# Altium PCB esp32-nrf24l01-jam_V2_backup.PcbDoc
Units mm, origin at the board's own origin, x right, y up, seen from the top; angles counter-clockwise.
Board outline 80 x 55 mm, 2 copper layers (Top Layer, Bottom Layer); 22 components, 23 nets, 98 pads, 63 vias.
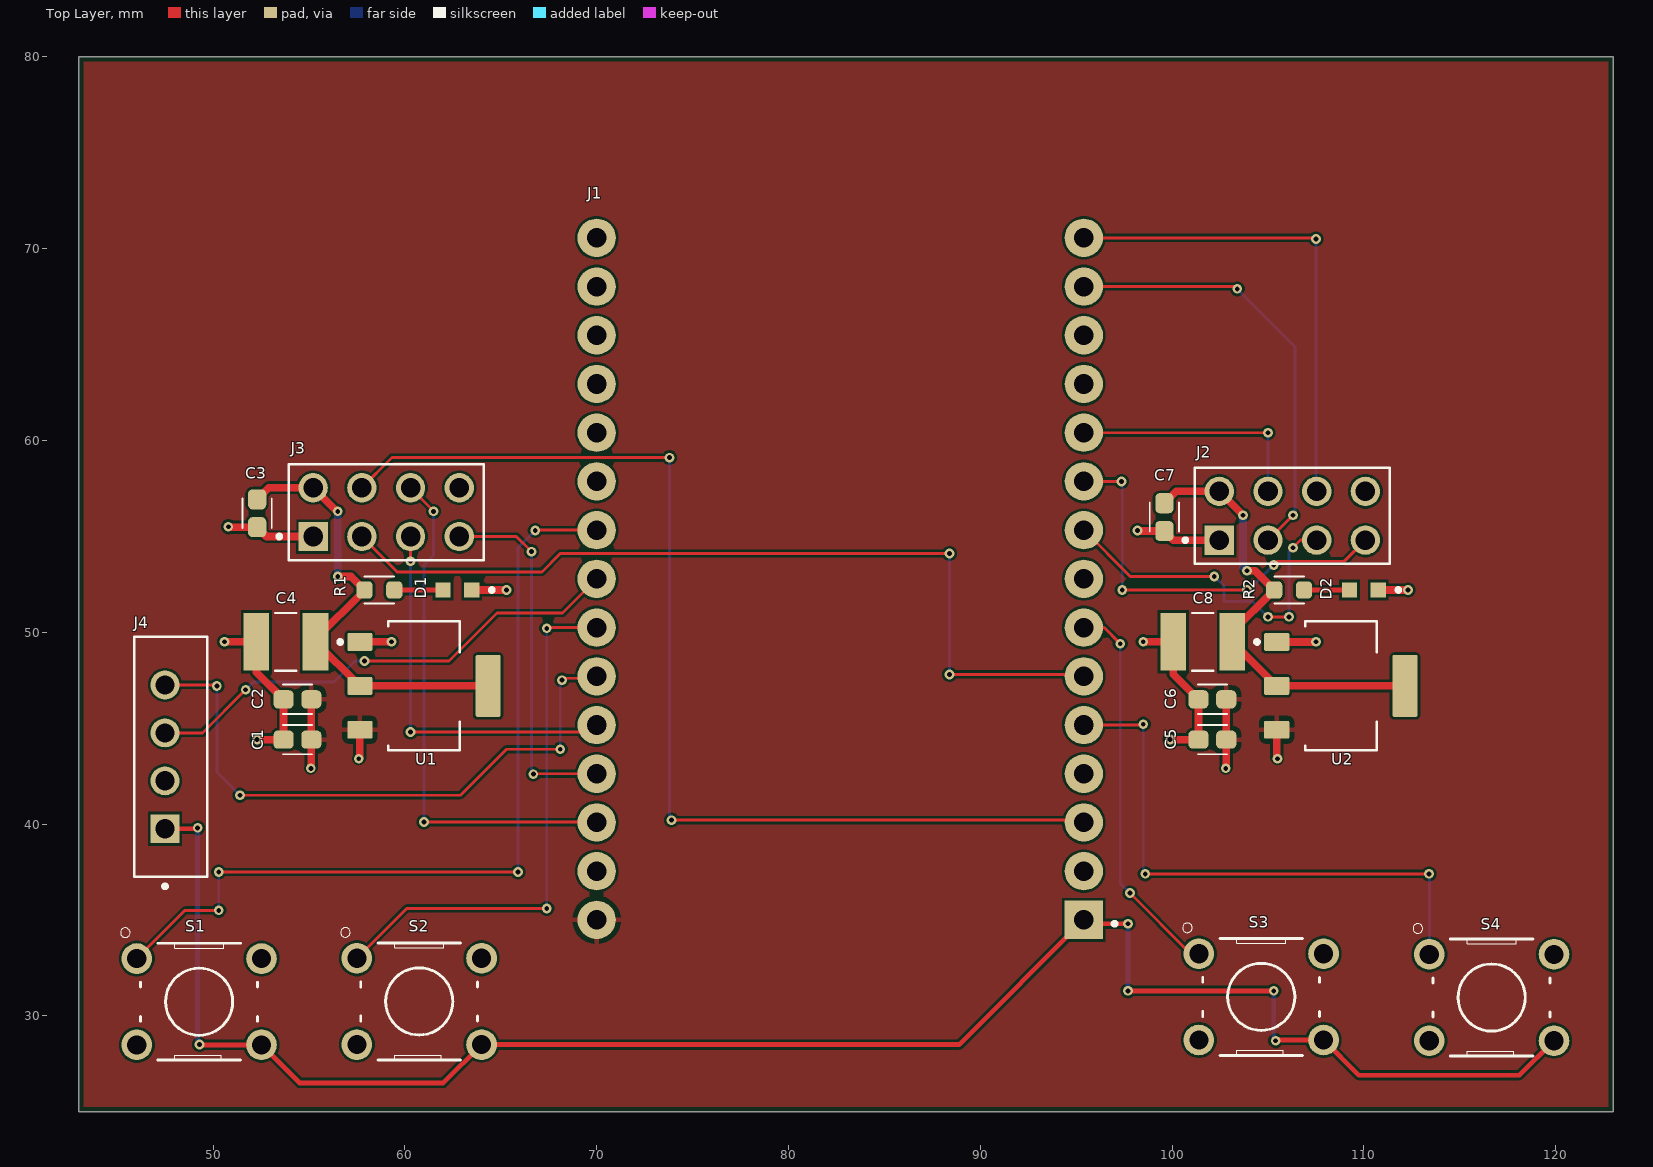
[diagram p0: Top Layer view]
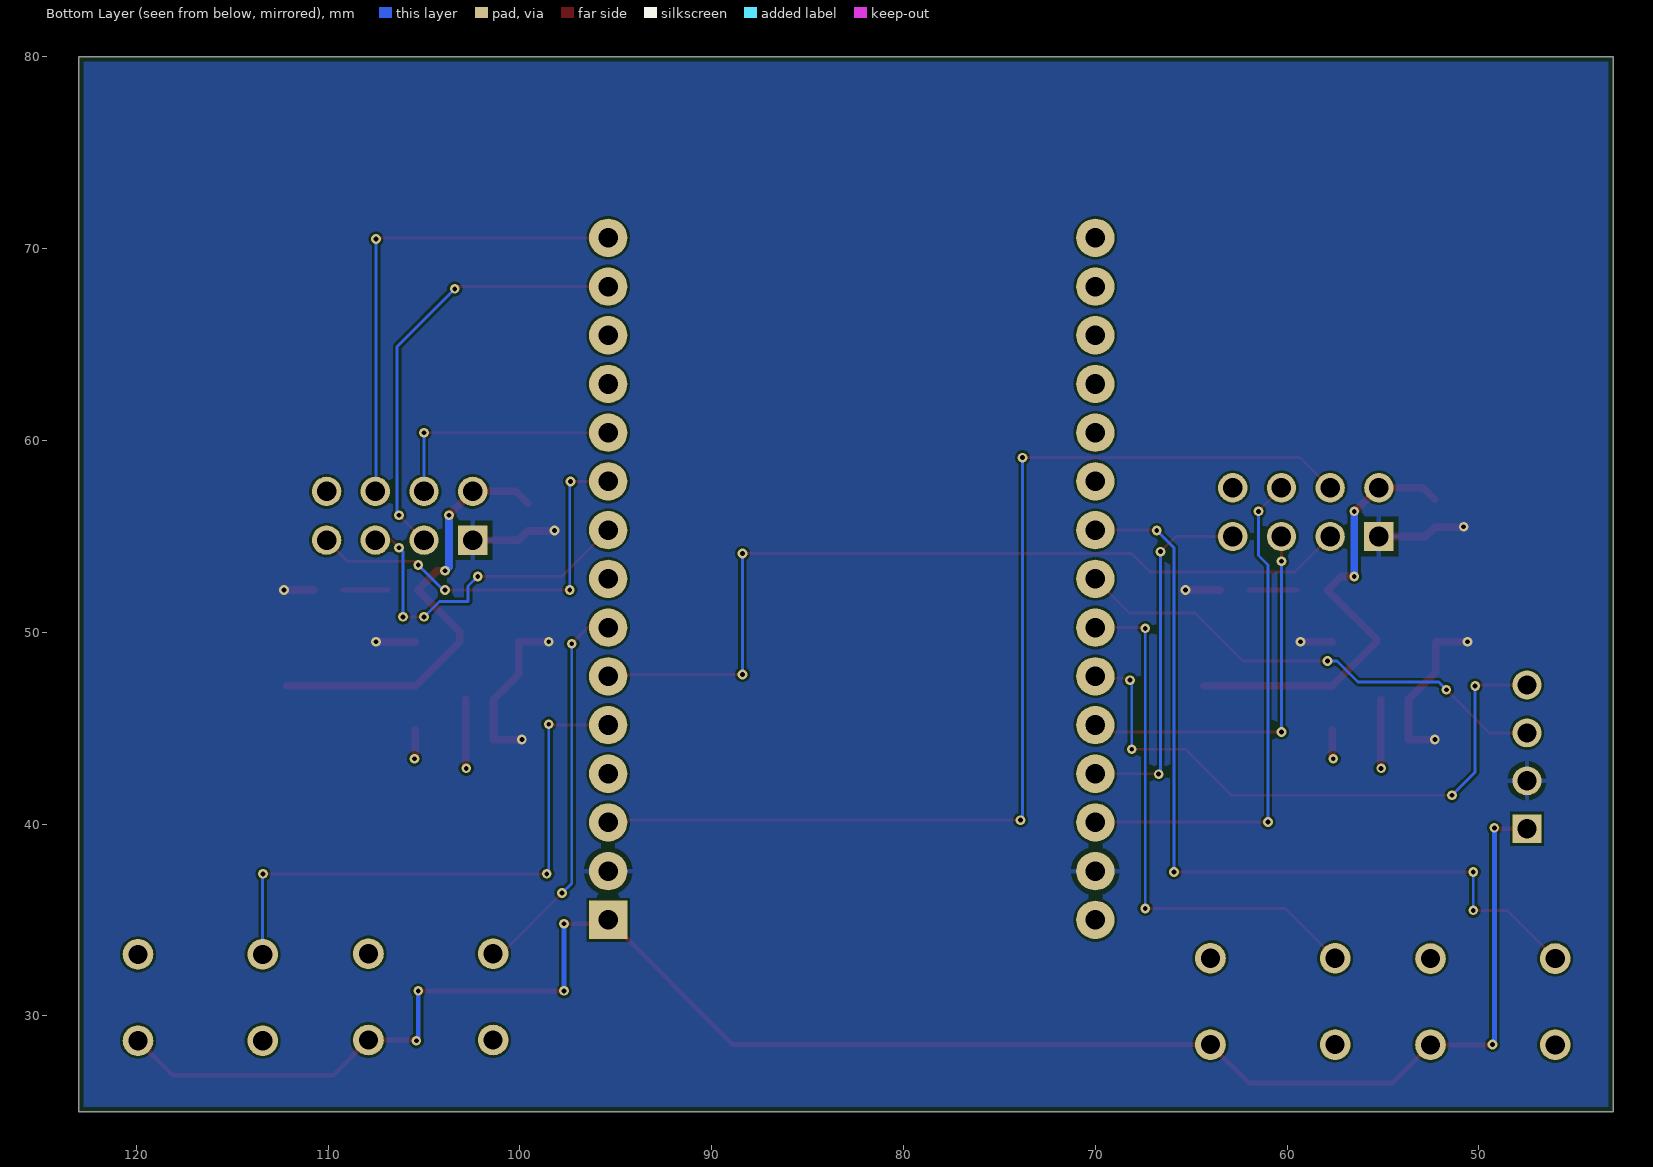
[diagram p1: Bottom Layer view, seen from below]
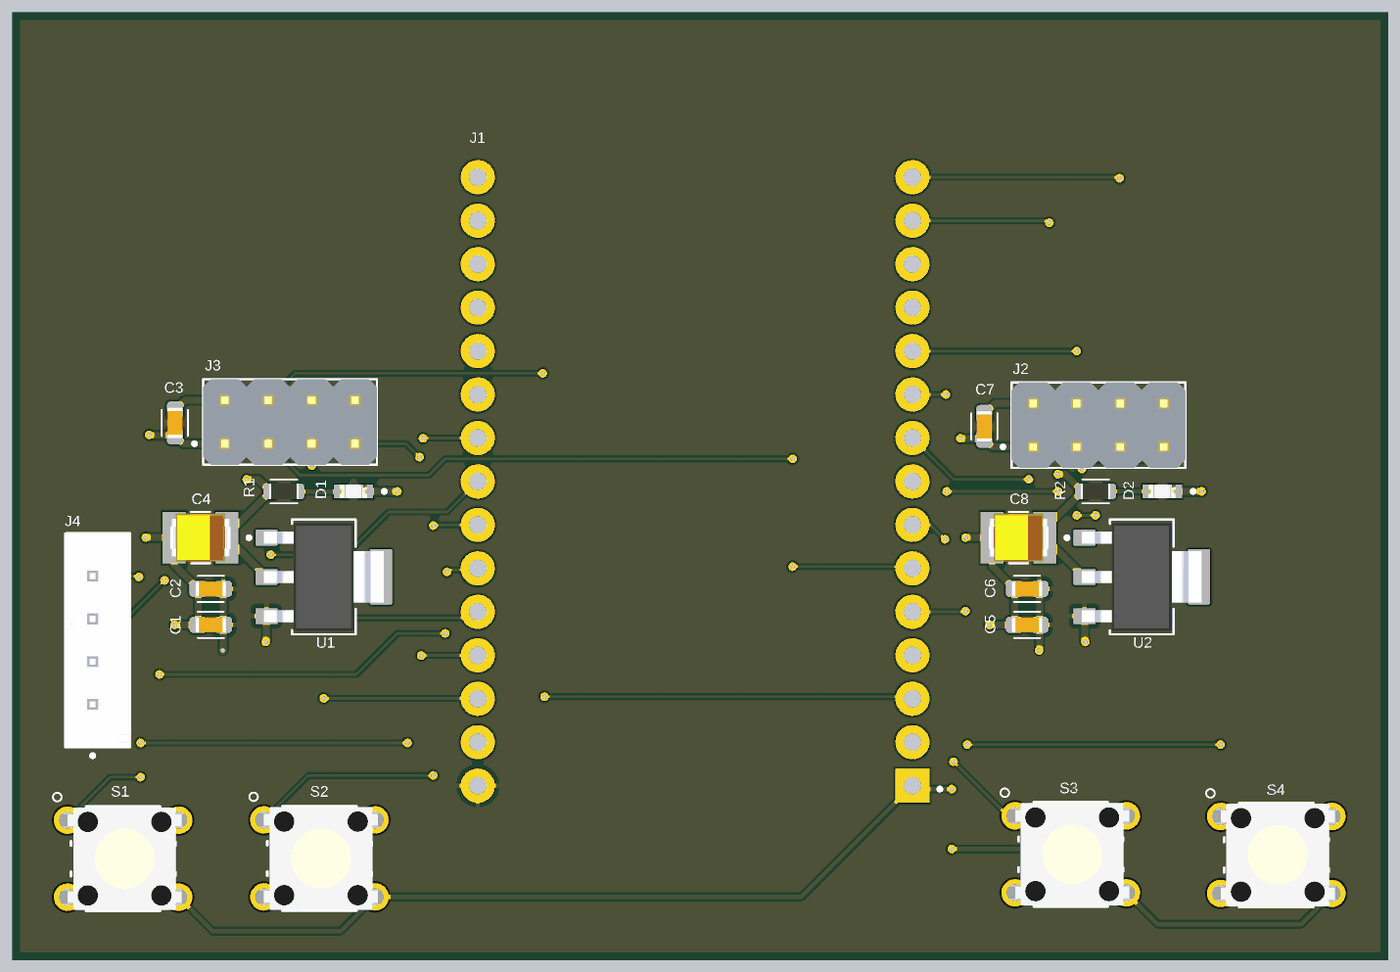
[diagram p2: 3D render of the assembled board from above, using the file's embedded part models]

## Layer stack, top to bottom
Top Solder: solder mask 0.0102, Solder Resist, Dk 3.5
Top Layer: signal copper 0.0356
Dielectric 1: dielectric 0.32, FR-4, Dk 4.8
Bottom Layer: signal copper 0.0356
Bottom Solder: solder mask 0.0102, Solder Resist, Dk 3.5

## Board outline
43,25 123,25 123,80 43,80

## Design rules (kind name [scope] priority, off if disabled: settings)
BoardOutlineClearance [All] p1: gap=0.25 ignorepadtopadclearanceinfootprint=FALSE
Clearance [All] p1: gap=0.127 ignorepadtopadclearanceinfootprint=FALSE
MinimumSolderMaskSliver [All] p1: minsoldermaskwidth=0.1
PolygonConnect [All] p1: thpad.connectstyle=Relief thpad.reliefconductorwidth=0.254 thpad.reliefentries=4 thpad.polygonreliefangle="90 Angle" thpad.airgapwidth=0.254 smdpad.connectstyle=Relief smdpad.reliefconductorwidth=0.254 smdpad.reliefentries=4 smdpad.polygonreliefangle="90 Angle" smdpad.airgapwidth=0.254 via.connectstyle=Direct via.reliefconductorwidth=0.254 via.reliefentries=4 via.polygonreliefangle="90 Angle" via.airgapwidth=0.254
RoutingVias [All] p1: holewidth=0.254 width=0.508 viastyle="Through Hole" minholewidth=0.254 minwidth=0.508 maxholewidth=0.254 maxwidth=0.508
SilkToSilkClearance [All] p1: silktosilkclearance=0.1
SilkToSolderMaskClearance [IsPad] p1: minsilkscreentomaskgap=0.1 clearancetoexposedcopper=TRUE
SolderMaskExpansion [All] p1: expansion=0.05 istentingtop=FALSE
SupplyNets "Schematic Supply Nets" [InNet('GND')] p1: voltage=0.000
Width Width_POWER [InNet('5V') Or InNet('3V3_HSPI') Or InNet('3V3_VSPI') Or InNet('GND')] p1: maxlimit=0.8 minlimit=0.254 preferedwidth=0.4
Width [All] p2: maxlimit=0.254 minlimit=0.127 preferedwidth=0.15
27 further rules are at their usual default settings.

## Components (designator, comment, footprint, x,y, rotation, side; value= is the part's Value field where it differs from the comment)
C1 "10µF" "C0603 - MURATA" 54.4,44.4 r0 top
C2 "100nF" "C0603 - MURATA" 54.4,46.5 r0 top
C3 "100nF" "C0603 - MURATA" 52.3,56.2 r90 top
C4 "22µF" CAPPC3528X210N 53.8,49.5 r180 top
C5 "10µF" "C0603 - MURATA" 102.1,44.4 r0 top
C6 "100nF" "C0603 - MURATA" 102.1,46.5 r0 top
C7 "100nF" "C0603 - MURATA" 99.6,56 r90 top
C8 "22µF" CAPPC3528X210N 101.6,49.5 r180 top
D1 "LED" LED_KT-0603R 62.738,52.197 r180 top value=100µF
D2 "LED" LED_KT-0603R 110,52.2 r180 top value=100µF
J1 "ESP32-DEVKIT-V1" MODULE_ESP32_DEVKIT_V1 82.7,50.515 r180 top
J2 "DS1021-2X4SF162-B" CONNFLY_DS1021-2X4SF162-B 106.27,56.07 r0 top
J3 "DS1021-2X4SF162-B" CONNFLY_DS1021-2X4SF162-B 59.028,56.258 r0 top
J4 "B4B-EH-A" JST_B4B-EH-A 47.498,43.501 r90 top
R1 "1kΩ" "R0603 - YAGEO" 58.674,52.197 r180 top
R2 "1kΩ" "R0603 - YAGEO" 106.1,52.2 r180 top
S1 "B3F-1000" SW_B3F-1000 49.276,30.734 r0 top
S2 "B3F-1000" SW_B3F-1000 60.75,30.75 r0 top
S3 "B3F-1000" SW_B3F-1000 104.648,30.988 r0 top
S4 "B3F-1000" SW_B3F-1000 116.661,30.952 r0 top
U1 "AMS1117-3.3" SOT229P700X180-4N 61,47.2 r270 top
U2 "AMS1117-3.3" SOT229P700X180-4N 108.8,47.2 r270 top

## Footprints (in the part's own frame and the unit in brackets; to place one, negate y for a bottom-side part, rotate by r counter-clockwise, add the part's x,y. Pads: shape width x height; smd on the part's side, far side on the other; paste and mask are expansions set on the pad)
"C0603 - MURATA" [mm]
  rrect50% 1.05x0.95 smd: 1(-0.725,0) 2(0.725,0)
  silkscreen extent -0.76,-0.76 0.76,0.76, body extent -0.9,-0.45 0.9,0.45, height 0.9
CAPPC3528X210N [mm]
  rect 1.34x3.02 smd: 1(-1.54,0) 2(1.54,0)
  silkscreen extent -0.55,-1.5 0.55,1.5, body extent -1.75,-1.4 1.75,1.4, height 2.1
CONNFLY_DS1021-2X4SF162-B [mm]
  rect 1.53x1.53 / inner round 1.53 / far side rect 1.53x1.53 hole 1.02 mask+0.102: 1(-3.81,-1.27)
  round 1.53 hole 1.02 mask+0.102: 2(-3.81,1.27) 3(-1.27,-1.27) 4(-1.27,1.27) 5(1.27,-1.27) 6(1.27,1.27) 7(3.81,-1.27) 8(3.81,1.27)
  silkscreen extent -5.68,-2.5 5.08,2.5, body extent -5.08,-2.5 5.08,2.5, height 7.5
JST_B4B-EH-A [mm]
  rect 1.508x1.508 / inner round 1.508 / far side rect 1.508x1.508 hole 1: 1(-3.75,0)
  round 1.508 hole 1: 2(-1.25,0) 3(1.25,0) 4(3.75,0)
  silkscreen extent -6.85,-2.2 6.25,1.6, body extent -6.25,-2.2 6.25,1.6, height 6
LED_KT-0603R [mm]
  rect 0.8x0.8 smd: 1(-0.75,0) 2(0.75,0)
  silkscreen extent -1.9,-0.1 -1.7,0.1, body extent -0.8,-0.4 0.8,0.4, height 0.65
MODULE_ESP32_DEVKIT_V1 [mm]
  rect 2x2 / inner round 2 / far side rect 2x2 hole 1.02: 1(-12.7,15.515)
  round 2 hole 1.02: 2(-12.7,12.975) 3(-12.7,10.435) 4(-12.7,7.895) 5(-12.7,5.355) 6(-12.7,2.815) 7(-12.7,0.275) 8(-12.7,-2.265) 9(-12.7,-4.805) 10(-12.7,-7.345) 11(-12.7,-9.885) 12(-12.7,-12.425) 13(-12.7,-14.965) 14(-12.7,-17.505) 15(-12.7,-20.045) 16(12.7,-20.045) 17(12.7,-17.505) 18(12.7,-14.965) 19(12.7,-12.425) 20(12.7,-9.885) 21(12.7,-7.345) 22(12.7,-4.805) 23(12.7,-2.265) 24(12.7,0.275) 25(12.7,2.815) 26(12.7,5.355) 27(12.7,7.895) 28(12.7,10.435) 29(12.7,12.975) 30(12.7,15.515)
  silkscreen extent -14.4,15.62 -14.2,15.81
"R0603 - YAGEO" [mm]
  rrect50% 0.85x0.9 smd: 1(-0.775,0) 2(0.775,0)
  silkscreen extent -0.77,-0.7 0.77,0.7, body extent -0.85,-0.45 0.85,0.45, height 0.55
SOT229P700X180-4N [mm]
  rrect15% 0.93x1.31 smd: 1(-2.29,-3.345) 2(0,-3.345) 3(2.29,-3.345)
  rrect15% 3.24x1.31 smd: 2(0,3.345)
  silkscreen extent -3.36,-4.47 3.36,1.86, body extent -3.15,-3.5 3.15,3.5, height 1.8
SW_B3F-1000 [mm]
  round 1.6 hole 1 mask+0.102: 1(-3.25,2.25) 2(3.25,2.25) 3(-3.25,-2.25) 4(3.25,-2.25)
  silkscreen extent -4.1,-3.05 3.05,3.85, body extent -3.76,-3 3.94,3, height 4.3

## Part data
C1 C5: library part "CAP - GENERIC", "16V 10uF X5R ±10% 0603 Multilayer Ceramic Capacitors MLCC - SMD/SMT ROHS", .Case/Package=0603, .Voltage Rating (DC)=16V, Case Code (Metric)=1608, Dielectric Material=Ceramic, Manufacturer=Murata, Manufacturer Lifecycle Status="IN PRODUCTION", Manufacturer Part Number=GRT188R61C106KE13D, Max Operating Temperature=85°C, Min Operating Temperature=-55°C, Ratings=AEC-Q200, Supplier Part Number=490-12317-1-ND, Tolerance=10%, Case Code (Imperial)=0603, Case/Package=0603, Category="Ceramic Capacitors", ComponentLink1Description=https://datasheet.octopart.com:443/GRT188R61C106KE13D-Murata-datasheet-149523582.pdf?src-supplier=Newark, ComponentLink1URL=https://datasheet.octopart.com:443/GRT188R61C106KE13D-Murata-datasheet-149523582.pdf?src-supplier=Newark, ComponentLink2Description=https://datasheet.octopart.com:443/GRT188R61C106KE13D-Murata-datasheet-141284621.pdf?src-supplier=Geoflip, ComponentLink2URL=https://datasheet.octopart.com:443/GRT188R61C106KE13D-Murata-datasheet-141284621.pdf?src-supplier=Geoflip, ComponentLink3Description=https://datasheet.octopart.com:443/GRT188R61C106KE13D-Murata-datasheet-165579666.pdf?src-supplier=TME, ComponentLink3URL=https://datasheet.octopart.com:443/GRT188R61C106KE13D-Murata-datasheet-165579666.pdf?src-supplier=TME, ComponentLink4Description=https://datasheet.octopart.com:443/GRT188R61C106KE13D-Murata-datasheet-140711311.pdf?src-supplier=Ciiva, ComponentLink4URL=https://datasheet.octopart.com:443/GRT188R61C106KE13D-Murata-datasheet-140711311.pdf?src-supplier=Ciiva, ComponentLink5Description=https://datasheet.octopart.com:443/GRT188R61C106KE13D-Murata-datasheet-138749117.pdf?src-supplier=Ciiva, ComponentLink5URL=https://datasheet.octopart.com:443/GRT188R61C106KE13D-Murata-datasheet-138749117.pdf?src-supplier=Ciiva, ComponentLink6Description=https://datasheet.octopart.com:443/GRT188R61C106KE13D-Murata-datasheet-82944875.pdf?src-supplier=Future+Electronics, ComponentLink6URL=https://datasheet.octopart.com:443/GRT188R61C106KE13D-Murata-datasheet-82944875.pdf?src-supplier=Future+Electronics, ComponentLink7Description=http://sigma.octopart.com:80/reach_statement/Murata-company-16.pdf?src-supplier=Compliance+Statements, ComponentLink7URL=http://sigma.octopart.com:80/reach_statement/Murata-company-16.pdf?src-supplier=Compliance+Statements, Export Control Classification Number (ECCN) Code=EAR99, Harmonized Tariff Schedule (HTS) Code=8532.24.00.20, Height=800µm, Introduction Date=2016-01-27, Length=1.6mm, Lifecycle Status=Production, Material=Ceramic, Mounting Technology="Surface Mount", Number of Terminals=2, Pricing="1=0,3, 10=0,175, 50=0,127, 100=0,1122, 500=0,08734 (USD)", REACH SVHC=Unaffected, RoHS=Compliant, Schedule B="8532240020, 8532240020|8532240020, 8532240020|8532240020|8532240020, 8532240020|8532240020|8532240020|8532240020", Stock=367580, Supplier=DigiKey, Voltage Rating=16V, Voltage Rating (DC)=16V, Width=800µm
C2 C3 C6 C7: library part "CAP - GENERIC", "50V 100nF X7R ±10% 0603 Multilayer Ceramic Capacitors MLCC - SMD/SMT ROHS", .Case/Package=0603, .Voltage Rating (DC)=50V, Case Code (Metric)=1608, Dielectric=X7R, Dielectric Material=Ceramic, Manufacturer=Murata, Manufacturer Part Number=GCM188R71H104KA57D, Max Operating Temperature=125°C, Min Operating Temperature=-55°C, Ratings=AEC-Q200, Supplier Part Number=490-4779-1-ND, Tolerance=10%, Case Code (Imperial)=0603, Case/Package=0603, Category="Ceramic Capacitors", ComponentLink1Description=https://datasheet.octopart.com:443/GCM188R71H104KA57D-Murata-datasheet-12557478.pdf?src-supplier=Upverter, ComponentLink1URL=https://datasheet.octopart.com:443/GCM188R71H104KA57D-Murata-datasheet-12557478.pdf?src-supplier=Upverter, ComponentLink2Description=https://datasheet.octopart.com:443/GCM188R71H104KA57D-Murata-datasheet-44104515.pdf?src-supplier=Upverter, ComponentLink2URL=https://datasheet.octopart.com:443/GCM188R71H104KA57D-Murata-datasheet-44104515.pdf?src-supplier=Upverter, ComponentLink3Description=https://datasheet.octopart.com:443/GCM188R71H104KA57D-Murata-datasheet-141267633.pdf?src-supplier=Geoflip, ComponentLink3URL=https://datasheet.octopart.com:443/GCM188R71H104KA57D-Murata-datasheet-141267633.pdf?src-supplier=Geoflip, ComponentLink4Description=https://datasheet.octopart.com:443/GCM188R71H104KA57D-Murata-datasheet-140658746.pdf?src-supplier=Ciiva, ComponentLink4URL=https://datasheet.octopart.com:443/GCM188R71H104KA57D-Murata-datasheet-140658746.pdf?src-supplier=Ciiva, ComponentLink5Description=https://datasheet.octopart.com:443/GCM188R71H104KA57D-Murata-datasheet-138718311.pdf?src-supplier=Ciiva, ComponentLink5URL=https://datasheet.octopart.com:443/GCM188R71H104KA57D-Murata-datasheet-138718311.pdf?src-supplier=Ciiva, ComponentLink6Description=https://datasheet.octopart.com:443/GCM188R71H104KA57D-Murata-datasheet-81455542.pdf?src-supplier=TME, ComponentLink6URL=https://datasheet.octopart.com:443/GCM188R71H104KA57D-Murata-datasheet-81455542.pdf?src-supplier=TME, ComponentLink7Description=https://datasheet.octopart.com:443/GCM188R71H104KA57D-Murata-datasheet-12515163.pdf?src-supplier=Farnell, ComponentLink7URL=https://datasheet.octopart.com:443/GCM188R71H104KA57D-Murata-datasheet-12515163.pdf?src-supplier=Farnell, ComponentLink8Description=https://datasheet.octopart.com:443/GCM188R71H104KA57D-Murata-datasheet-11771429.pdf?src-supplier=Arrow+Electronics, ComponentLink8URL=https://datasheet.octopart.com:443/GCM188R71H104KA57D-Murata-datasheet-11771429.pdf?src-supplier=Arrow+Electronics, ComponentLink9Description=http://sigma.octopart.com:80/reach_statement/Murata-company-16.pdf?src-supplier=Compliance+Statements, ComponentLink9URL=http://sigma.octopart.com:80/reach_statement/Murata-company-16.pdf?src-supplier=Compliance+Statements, Depth=800µm, Height=800µm, Lead Free="Lead Free", Length=1.6mm, Lifecycle Status=Production, Mounting Technology="Surface Mount", Number of Terminals=2, Packaging="Tape and Reel", Pins=2, Pricing="1=0,2, 10=0,114, 50=0,0812, 100=0,071, 500=0,05398 (USD)", Radiation Hardening=No, REACH SVHC=Unaffected, RoHS=Compliant, Schedule B="8532240020, 8532240020|8532240020, 8532240020|8532240020|8532240020, 8532240020|8532240020|8532240020|8532240020", Stock=1972292, Supplier=DigiKey, Termination=SMD/SMT, Voltage=50V, Voltage Rating=50V, Voltage Rating (DC)=50V, Width=800µm
C4 C8: library part TAJB226K010RNJ, "Cap Tant Solid 22uF 10V B CASE 10%( 3.5 X 2.8 X 1.9mm) Inward L SMD 3528-21 2.4 Ohm 125C T/R", .Case/Package=1210, .Voltage Rating (DC)=10V, Case Code (Metric)=3528, Dielectric Material=Tantalum, ESR (Equivalent Series Resistance)=2.4Ω, Leakage Current=2.2µA, Manufacturer="KYOCERA AVX", Max Operating Temperature=125°C, Min Operating Temperature=-55°C, Ripple Current=75mA, Tolerance=10%, Case Code (Imperial)=1210, Case/Package=1210, Category="Tantalum Capacitors", Check_prices=https://www.snapeda.com/parts/TAJB226K010RNJ/Kyocera/view-part/?ref=eda, China RoHS=Compliant, ComponentLink1Description=https://datasheet.octopart.com:443/TAJB226K010RNJ-KYOCERA-AVX-datasheet-166923940.pdf?src-supplier=Amar+Radio+Corporation, ComponentLink1URL=https://datasheet.octopart.com:443/TAJB226K010RNJ-KYOCERA-AVX-datasheet-166923940.pdf?src-supplier=Amar+Radio+Corporation, ComponentLink2Description=https://sigma.octopart.com:443/151364110/technical_drawing/AVX-TAJB226K010RNJ.pdf?src-supplier=Upverter, ComponentLink2URL=https://sigma.octopart.com:443/151364110/technical_drawing/AVX-TAJB226K010RNJ.pdf?src-supplier=Upverter, ComponentLink3Description=https://datasheet.octopart.com:443/TAJB226K010RNJ-AVX-datasheet-37096286.pdf?src-supplier=Upverter, ComponentLink3URL=https://datasheet.octopart.com:443/TAJB226K010RNJ-AVX-datasheet-37096286.pdf?src-supplier=Upverter, ComponentLink4Description=https://datasheet.octopart.com/TAJB226K010RNJ-AVX---Kyocera-datasheet-12511273.pdf, ComponentLink4URL=https://datasheet.octopart.com/TAJB226K010RNJ-AVX---Kyocera-datasheet-12511273.pdf, ComponentLink5Description=https://datasheet.octopart.com/TAJB226K010RNJ-AVX---Kyocera-datasheet-8359467.pdf, ComponentLink5URL=https://datasheet.octopart.com/TAJB226K010RNJ-AVX---Kyocera-datasheet-8359467.pdf, ComponentLink6Description=https://datasheet.octopart.com/TAJB226K010RNJ-AVX---Kyocera-datasheet-8398506.pdf, ComponentLink6URL=https://datasheet.octopart.com/TAJB226K010RNJ-AVX---Kyocera-datasheet-8398506.pdf, ComponentLink7Description=https://datasheet.octopart.com/TAJ-Series---Standard-Tantalum-AVX-datasheet-family-88.pdf, ComponentLink7URL=https://datasheet.octopart.com/TAJ-Series---Standard-Tantalum-AVX-datasheet-family-88.pdf, ComponentLink8Description=https://datasheet.octopart.com:443/TAJB226K010RNJ-AVX-datasheet-10916590.pdf?src-supplier=Future+Electronics, ComponentLink8URL=https://datasheet.octopart.com:443/TAJB226K010RNJ-AVX-datasheet-10916590.pdf?src-supplier=Future+Electronics, ComponentLink9Description=https://datasheet.octopart.com:443/TAJB226K010RNJ-AVX-datasheet-11475269.pdf?src-supplier=Future+Electronics, ComponentLink9URL=https://datasheet.octopart.com:443/TAJB226K010RNJ-AVX-datasheet-11475269.pdf?src-supplier=Future+Electronics, ComponentLink10Description=https://datasheet.octopart.com:443/TAJB226K010RNJ-AVX-datasheet-10851837.pdf?src-supplier=Future+Electronics, ComponentLink10URL=https://datasheet.octopart.com:443/TAJB226K010RNJ-AVX-datasheet-10851837.pdf?src-supplier=Future+Electronics, ComponentLink11Description=https://datasheet.octopart.com:443/TAJB226K010RNJ-AVX-datasheet-10839255.pdf?src-supplier=Future+Electronics, ComponentLink11URL=https://datasheet.octopart.com:443/TAJB226K010RNJ-AVX-datasheet-10839255.pdf?src-supplier=Future+Electronics, ComponentLink12Description=https://datasheet.octopart.com:443/TAJB226K010RNJ-AVX-datasheet-10620092.pdf?src-supplier=Future+Electronics, ComponentLink12URL=https://datasheet.octopart.com:443/TAJB226K010RNJ-AVX-datasheet-10620092.pdf?src-supplier=Future+Electronics, ComponentLink13Description=https://datasheet.octopart.com:443/TAJB226K010RNJ-AVX-datasheet-10545425.pdf?src-supplier=Future+Electronics, ComponentLink13URL=https://datasheet.octopart.com:443/TAJB226K010RNJ-AVX-datasheet-10545425.pdf?src-supplier=Future+Electronics, ComponentLink14Description=https://datasheet.octopart.com:443/TAJB226K010RNJ-AVX-datasheet-10403705.pdf?src-supplier=Future+Electronics, ComponentLink14URL=https://datasheet.octopart.com:443/TAJB226K010RNJ-AVX-datasheet-10403705.pdf?src-supplier=Future+Electronics, ComponentLink15Description=https://datasheet.octopart.com:443/TAJB226K010RNJ-AVX-datasheet-10380087.pdf?src-supplier=Future+Electronics, ComponentLink15URL=https://datasheet.octopart.com:443/TAJB226K010RNJ-AVX-datasheet-10380087.pdf?src-supplier=Future+Electronics, ComponentLink16Description=https://datasheet.octopart.com:443/TAJB226K010RNJ-AVX-datasheet-10285639.pdf?src-supplier=Future+Electronics, ComponentLink16URL=https://datasheet.octopart.com:443/TAJB226K010RNJ-AVX-datasheet-10285639.pdf?src-supplier=Future+Electronics, ComponentLink17Description=https://datasheet.octopart.com:443/TAJB226K010RNJ-AVX-datasheet-10193294.pdf?src-supplier=Future+Electronics, ComponentLink17URL=https://datasheet.octopart.com:443/TAJB226K010RNJ-AVX-datasheet-10193294.pdf?src-supplier=Future+Electronics, ComponentLink18Description=https://datasheet.octopart.com:443/TAJB226K010RNJ-AVX-datasheet-10028080.pdf?src-supplier=Future+Electronics, ComponentLink18URL=https://datasheet.octopart.com:443/TAJB226K010RNJ-AVX-datasheet-10028080.pdf?src-supplier=Future+Electronics, ComponentLink19Description=https://datasheet.octopart.com:443/TAJB226K010RNJ-AVX-datasheet-8877386.pdf?src-supplier=Future+Electronics, ComponentLink19URL=https://datasheet.octopart.com:443/TAJB226K010RNJ-AVX-datasheet-8877386.pdf?src-supplier=Future+Electronics, ComponentLink20Description=https://datasheet.octopart.com:443/TAJB226K010RNJ-AVX-datasheet-8858887.pdf?src-supplier=Future+Electronics, ComponentLink20URL=https://datasheet.octopart.com:443/TAJB226K010RNJ-AVX-datasheet-8858887.pdf?src-supplier=Future+Electronics, ComponentLink21Description=https://datasheet.octopart.com:443/TAJB226K010RNJ-AVX-datasheet-8853265.pdf?src-supplier=Future+Electronics, ComponentLink21URL=https://datasheet.octopart.com:443/TAJB226K010RNJ-AVX-datasheet-8853265.pdf?src-supplier=Future+Electronics, ComponentLink22Description=https://datasheet.octopart.com:443/TAJB226K010RNJ-AVX-datasheet-8836325.pdf?src-supplier=Future+Electronics, ComponentLink22URL=https://datasheet.octopart.com:443/TAJB226K010RNJ-AVX-datasheet-8836325.pdf?src-supplier=Future+Electronics, ComponentLink23Description=https://datasheet.octopart.com:443/TAJB226K010RNJ-AVX-datasheet-8715220.pdf?src-supplier=Future+Electronics, ComponentLink23URL=https://datasheet.octopart.com:443/TAJB226K010RNJ-AVX-datasheet-8715220.pdf?src-supplier=Future+Electronics, ComponentLink24Description=https://datasheet.octopart.com:443/TAJB226K010RNJ-AVX-datasheet-8701730.pdf?src-supplier=Future+Electronics, ComponentLink24URL=https://datasheet.octopart.com:443/TAJB226K010RNJ-AVX-datasheet-8701730.pdf?src-supplier=Future+Electronics, ComponentLink25Description=https://datasheet.octopart.com:443/TAJB226K010RNJ-AVX-datasheet-8621976.pdf?src-supplier=Future+Electronics, ComponentLink25URL=https://datasheet.octopart.com:443/TAJB226K010RNJ-AVX-datasheet-8621976.pdf?src-supplier=Future+Electronics, ComponentLink26Description=https://datasheet.octopart.com:443/TAJB226K010RNJ-AVX-datasheet-8447299.pdf?src-supplier=Future+Electronics, ComponentLink26URL=https://datasheet.octopart.com:443/TAJB226K010RNJ-AVX-datasheet-8447299.pdf?src-supplier=Future+Electronics, ComponentLink27Description=https://datasheet.octopart.com:443/TAJB226K010RNJ-AVX-datasheet-5428838.pdf?src-supplier=Future+Electronics, ComponentLink27URL=https://datasheet.octopart.com:443/TAJB226K010RNJ-AVX-datasheet-5428838.pdf?src-supplier=Future+Electronics, ComponentLink28Description=https://datasheet.octopart.com:443/TAJB226K010RNJ-AVX-datasheet-5393561.pdf?src-supplier=Future+Electronics, ComponentLink28URL=https://datasheet.octopart.com:443/TAJB226K010RNJ-AVX-datasheet-5393561.pdf?src-supplier=Future+Electronics, ComponentLink29Description=https://datasheet.octopart.com:443/TAJB226K010RNJ-AVX-datasheet-5308206.pdf?src-supplier=Future+Electronics, ComponentLink29URL=https://datasheet.octopart.com:443/TAJB226K010RNJ-AVX-datasheet-5308206.pdf?src-supplier=Future+Electronics, ComponentLink30Description=https://datasheet.octopart.com:443/TAJB226K010RNJ-AVX-datasheet-8324253.pdf?src-supplier=Newark, ComponentLink30URL=https://datasheet.octopart.com:443/TAJB226K010RNJ-AVX-datasheet-8324253.pdf?src-supplier=Newark, ComponentLink31Description=https://datasheet.octopart.com:443/TAJB226K010RNJ-KYOCERA-AVX-datasheet-158174673.pdf?src-supplier=element14+APAC, ComponentLink31URL=https://datasheet.octopart.com:443/TAJB226K010RNJ-KYOCERA-AVX-datasheet-158174673.pdf?src-supplier=element14+APAC, ComponentLink32Description=https://datasheet.octopart.com:443/TAJB226K010RNJ-KYOCERA-AVX-datasheet-62304617.pdf?src-supplier=element14+APAC, ComponentLink32URL=https://datasheet.octopart.com:443/TAJB226K010RNJ-KYOCERA-AVX-datasheet-62304617.pdf?src-supplier=element14+APAC, ComponentLink33Description=https://datasheet.octopart.com:443/TAJB226K010RNJ-KYOCERA-AVX-datasheet-50868559.pdf?src-supplier=AVX, ComponentLink33URL=https://datasheet.octopart.com:443/TAJB226K010RNJ-KYOCERA-AVX-datasheet-50868559.pdf?src-supplier=AVX, ComponentLink34Description=https://datasheet.octopart.com:443/TAJB226K010RNJ-KYOCERA-AVX-datasheet-156093874.pdf?src-supplier=TME, ComponentLink34URL=https://datasheet.octopart.com:443/TAJB226K010RNJ-KYOCERA-AVX-datasheet-156093874.pdf?src-supplier=TME, ComponentLink35Description=https://datasheet.octopart.com:443/TAJB226K010RNJ-AVX---Kyocera-datasheet-17704380.pdf?src-supplier=TME, ComponentLink35URL=https://datasheet.octopart.com:443/TAJB226K010RNJ-AVX---Kyocera-datasheet-17704380.pdf?src-supplier=TME, ComponentLink36Description=https://datasheet.octopart.com:443/TAJB226K010RNJ-AVX-datasheet-110600193.pdf?src-supplier=RS+(Formerly+Allied+Electronics), ComponentLink36URL=https://datasheet.octopart.com:443/TAJB226K010RNJ-AVX-datasheet-110600193.pdf?src-supplier=RS+(Formerly+Allied+Electronics), ComponentLink37Description=https://datasheet.octopart.com:443/TAJB226K010RNJ-AVX-datasheet-37470702.pdf?src-supplier=RS+(Formerly+Allied+Electronics), ComponentLink37URL=https://datasheet.octopart.com:443/TAJB226K010RNJ-AVX-datasheet-37470702.pdf?src-supplier=RS+(Formerly+Allied+Electronics), ComponentLink38Description=https://datasheet.octopart.com:443/TAJB226K010RNJ-AVX-datasheet-10618018.pdf?src-supplier=RS+(Formerly+Allied+Electronics), ComponentLink38URL=https://datasheet.octopart.com:443/TAJB226K010RNJ-AVX-datasheet-10618018.pdf?src-supplier=RS+(Formerly+Allied+Electronics), ComponentLink39Description=https://datasheet.octopart.com:443/TAJB226K010RNJ-AVX-datasheet-14185837.pdf?src-supplier=iiiC, ComponentLink39URL=https://datasheet.octopart.com:443/TAJB226K010RNJ-AVX-datasheet-14185837.pdf?src-supplier=iiiC, ComponentLink40Description=https://datasheet.octopart.com:443/TAJB226K010RNJ-AVX-datasheet-30457685.pdf?src-supplier=Seeed+Studio, ComponentLink40URL=https://datasheet.octopart.com:443/TAJB226K010RNJ-AVX-datasheet-30457685.pdf?src-supplier=Seeed+Studio, ComponentLink41Description=https://datasheet.octopart.com:443/TAJB226K010RNJ-AVX-datasheet-8314219.pdf?src-supplier=Garrett, ComponentLink41URL=https://datasheet.octopart.com:443/TAJB226K010RNJ-AVX-datasheet-8314219.pdf?src-supplier=Garrett, ComponentLink42Description=https://datasheet.octopart.com:443/TAJB226K010RNJ-AVX-datasheet-15568.pdf?src-supplier=Garrett, ComponentLink42URL=https://datasheet.octopart.com:443/TAJB226K010RNJ-AVX-datasheet-15568.pdf?src-supplier=Garrett, ComponentLink43Description=https://datasheet.octopart.com:443/TAJB226K010RNJ-AVX-datasheet-504259.pdf?src-supplier=Farnell, ComponentLink43URL=https://datasheet.octopart.com:443/TAJB226K010RNJ-AVX-datasheet-504259.pdf?src-supplier=Farnell, ComponentLink44Description=https://datasheet.octopart.com:443/TAJB226K010RNJ-AVX-datasheet-508120.pdf?src-supplier=Farnell, ComponentLink44URL=https://datasheet.octopart.com:443/TAJB226K010RNJ-AVX-datasheet-508120.pdf?src-supplier=Farnell, ComponentLink45Description=https://datasheet.octopart.com:443/TAJB226K010RNJ-AVX-datasheet-111970.pdf?src-supplier=Sierra+IC, ComponentLink45URL=https://datasheet.octopart.com:443/TAJB226K010RNJ-AVX-datasheet-111970.pdf?src-supplier=Sierra+IC, ComponentLink46Description=http://sigma.octopart.com:80/rohs_certificate/TAJ-Series---Standard-Tantalum-AVX-family-89.pdf?src-supplier=Compliance+Statements, ComponentLink46URL=http://sigma.octopart.com:80/rohs_certificate/TAJ-Series---Standard-Tantalum-AVX-family-89.pdf?src-supplier=Compliance+Statements, ComponentLink47Description=http://sigma.octopart.com:80/conflict_mineral_statement/AVX-company-34.pdf?src-supplier=Compliance+Statements, ComponentLink47URL=http://sigma.octopart.com:80/conflict_mineral_statement/AVX-company-34.pdf?src-supplier=Compliance+Statements, ComponentLink48Description=http://sigma.octopart.com:80/reach_statement/AVX-company-19.pdf?src-supplier=Compliance+Statements, ComponentLink48URL=http://sigma.octopart.com:80/reach_statement/AVX-company-19.pdf?src-supplier=Compliance+Statements, Country of Origin="Czechia, El Salvador", Depth=2.8mm, Dissipation Factor=6%, Export Control Classification Number (ECCN) Code=EAR99, Features="General Purpose", Harmonized Tariff Schedule (HTS) Code=8532.21.00.50, Height=1.9mm, Height - Seated (Max)=2.1082mm, Introduction Date=2005-08-24, Lead Free="Lead Free", Length=3.5mm, Life (Hours)=2000hours, Lifecycle Status=Production, Manufacturer Part Number=TAJB226K010RNJ, MF="KYOCERA AVX Components Corporation", Mounting Technology="Surface Mount", MP=TAJB226K010RNJ, Number of Terminals=2, Pins=2, Polarity=Polar, Pricing="2000=0,1434 (USD)", Radiation Hardening=No, REACH SVHC=Unaffected, RoHS=Compliant, Schedule B=8532210050, SnapEDA_Link=https://www.snapeda.com/parts/TAJB226K010RNJ/Kyocera/view-part/?ref=snap, Stock=412000, Supplier="Arrow Electronics", Supplier Part Number=TAJB226K010RNJ, Termination=SMD/SMT, Voltage=10V, Voltage Rating=10V, Voltage Rating (DC)=10V, Width=2.8mm
D1 D2: "Single-color LEDs; LITEON; LTST-C190KRKT; Red; 130 °; 2.4 V; 0603", .Case/Package=0603, .Color=Red, Case Code (Metric)=1608, Forward Current=25mA, Forward Voltage=2.4V, Lens Color="Clear, Colorless", Manufacturer="Diodes Inc.", Manufacturer Part Number=LTST-C190KRKT, Max Operating Temperature=85°C, Min Operating Temperature=-30°C, Power Dissipation=62.5mW, Power Rating=75mW, Reverse Voltage=5V, Supplier Part Number=160-1436-6-ND, Test Current=20mA, Tolerance=20%, Voltage Rating=50V, Case Code (Imperial)=0603, Case/Package=0603, Category=LEDs, China RoHS=Compliant, Color=Red, ComponentLink1Description=https://datasheet.octopart.com:443/LTST-C190KRKT-Lite-On-datasheet-32047000.pdf?src-supplier=Upverter, ComponentLink1URL=https://datasheet.octopart.com:443/LTST-C190KRKT-Lite-On-datasheet-32047000.pdf?src-supplier=Upverter, ComponentLink2Description=https://datasheet.octopart.com:443/LTST-C190KRKT-Lite-On-datasheet-114749306.pdf?src-supplier=ODG+(Origin+Data+Global), ComponentLink2URL=https://datasheet.octopart.com:443/LTST-C190KRKT-Lite-On-datasheet-114749306.pdf?src-supplier=ODG+(Origin+Data+Global), ComponentLink3Description=https://datasheet.octopart.com:443/LTST-C190KRKT-Lite-On-datasheet-166650849.pdf?src-supplier=IHS, ComponentLink3URL=https://datasheet.octopart.com:443/LTST-C190KRKT-Lite-On-datasheet-166650849.pdf?src-supplier=IHS, ComponentLink4Description=https://datasheet.octopart.com:443/LTST-C190KRKT-Lite-On-datasheet-158191.pdf?src-supplier=_legacy+Avnet, ComponentLink4URL=https://datasheet.octopart.com:443/LTST-C190KRKT-Lite-On-datasheet-158191.pdf?src-supplier=_legacy+Avnet, ComponentLink5Description=https://datasheet.octopart.com:443/LTST-C190KRKT-Lite-On-datasheet-165573809.pdf?src-supplier=TME, ComponentLink5URL=https://datasheet.octopart.com:443/LTST-C190KRKT-Lite-On-datasheet-165573809.pdf?src-supplier=TME, ComponentLink6Description=https://datasheet.octopart.com:443/LTST-C190KRKT-Lite-On-datasheet-165573808.pdf?src-supplier=TME, ComponentLink6URL=https://datasheet.octopart.com:443/LTST-C190KRKT-Lite-On-datasheet-165573808.pdf?src-supplier=TME, ComponentLink7Description=https://datasheet.octopart.com:443/LTST-C190KRKT-Lite-On-datasheet-12557188.pdf?src-supplier=Future+Electronics, ComponentLink7URL=https://datasheet.octopart.com:443/LTST-C190KRKT-Lite-On-datasheet-12557188.pdf?src-supplier=Future+Electronics, ComponentLink8Description=https://datasheet.octopart.com:443/LTST-C190KRKT-Lite-On-datasheet-8329900.pdf?src-supplier=Future+Electronics, ComponentLink8URL=https://datasheet.octopart.com:443/LTST-C190KRKT-Lite-On-datasheet-8329900.pdf?src-supplier=Future+Electronics, ComponentLink9Description=https://datasheet.octopart.com:443/LTST-C190KRKT-Lite-On-datasheet-8319956.pdf?src-supplier=Jameco+(USA), ComponentLink9URL=https://datasheet.octopart.com:443/LTST-C190KRKT-Lite-On-datasheet-8319956.pdf?src-supplier=Jameco+(USA), ComponentLink10Description=https://datasheet.octopart.com:443/LTST-C190KRKT-Lite-On-datasheet-94958.pdf?src-supplier=DigiKey, ComponentLink10URL=https://datasheet.octopart.com:443/LTST-C190KRKT-Lite-On-datasheet-94958.pdf?src-supplier=DigiKey, Country of Origin="Mainland China", Depth=800µm, Diameter=8mm, Dominant Wavelength=631nm, Export Control Classification Number (ECCN) Code=EAR99, Harmonized Tariff Schedule (HTS) Code=8541.40.20.00, Height=800µm, Illumination Color=Red, Introduction Date=2000-01-01, Lead Free="Lead Free", Lead Pitch=3.5mm, Length=11.5mm, Lens Style=Clear, Lens Transparency=Clear, Lifecycle Status=Production, Luminous Intensity=18mcd, Mounting Technology="Surface Mount", Number of Circuits=1, Number of Elements=1, Number of LEDs=1, Number of Terminals=2, Packaging=Bulk, Peak Wavelength=639nm, Pins=2, Pricing="1=0,14, 10=0,098, 100=0,0675, 500=0,0534, 1000=0,04869, 2000=0,04467 (USD)", Radiation Hardening=No, REACH SVHC=Unaffected, RoHS=Compliant, Schedule B="8541402000, 8541402000|8541402000, 8541402000|8541402000|8541402000, 8541402000|8541402000|8541402000|8541402000", Shape=Rectangular, Stock=1070254, Supplier=DigiKey, Viewing Angle=260°, Voltage Rating (DC)=50V, Wavelength=631nm, Width=800µm
J1: "Dual core, Wi-Fi: 2.4 GHz up to 150 Mbits/s,BLE (Bluetooth Low Energy) and legacy Bluetooth, 32 bits, Up to 240 MHz", Package=None, Check_prices=https://www.snapeda.com/parts/ESP32-DEVKIT-V1/Do+it/view-part/?ref=eda, MF="Do it", MP=ESP32-DEVKIT-V1, SnapEDA_Link=https://www.snapeda.com/parts/ESP32-DEVKIT-V1/Do+it/view-part/?ref=snap
J2 J3: "Pin header; pin strips; male; PIN: 8; straight; 2.54mm; THT; 2x4", Package=None, Check_prices=https://www.snapeda.com/parts/DS1021-2X4SF162-B/Connfly/view-part/?ref=eda, MF=Connfly, MP=DS1021-2X4SF162-B, SnapEDA_Link=https://www.snapeda.com/parts/DS1021-2X4SF162-B/Connfly/view-part/?ref=snap
J4: "Connector Header Through Hole 4 position 0.098 (2.50mm)", Package=None, Check_prices=https://www.snapeda.com/parts/B4B-EH-A/JST/view-part/?ref=eda, MF=JST, MP=B4B-EH-A, SnapEDA_Link=https://www.snapeda.com/parts/B4B-EH-A/JST/view-part/?ref=snap
R1 R2: library part "RESISTOR - GENERIC", "Res Thick Film 0603 1K Ohm 1% 0.1W(1/10W) ±100ppm/°C Pad SMD T/R / RES SMD 1K OHM 1% 1/10W 0603", .Case/Package=0603, .Tolerance=1%, Manufacturer="Yageo Group", Manufacturer Part Number=RC0603FR-071KL, Max Operating Temperature=155°C, Min Operating Temperature=-55°C, Power Rating=100mW, Supplier Part Number=311-1.00KHRDKR-ND, Temperature Coefficient=100ppm/°C, Voltage Rating=50V, Working Voltage=75V, Case Code (Imperial)=0603, Case Code (Metric)=0603, Case/Package=0603, Category="Chip SMD Resistors", China RoHS=Non-Compliant, ComponentLink1Description=https://datasheet.octopart.com:443/RC0603FR-071KL-Yageo-datasheet-175887523.pdf?src-supplier=Newark, ComponentLink1URL=https://datasheet.octopart.com:443/RC0603FR-071KL-Yageo-datasheet-175887523.pdf?src-supplier=Newark, ComponentLink2Description=https://datasheet.octopart.com:443/RC0603FR-071KL-Yageo-datasheet-34211833.pdf?src-supplier=Newark, ComponentLink2URL=https://datasheet.octopart.com:443/RC0603FR-071KL-Yageo-datasheet-34211833.pdf?src-supplier=Newark, ComponentLink3Description=https://datasheet.octopart.com:443/RC0603FR-071KL-Yageo-datasheet-12596169.pdf?src-supplier=Newark, ComponentLink3URL=https://datasheet.octopart.com:443/RC0603FR-071KL-Yageo-datasheet-12596169.pdf?src-supplier=Newark, ComponentLink4Description=https://datasheet.octopart.com:443/RC0603FR-071KL-Yageo-datasheet-499455.pdf?src-supplier=Newark, ComponentLink4URL=https://datasheet.octopart.com:443/RC0603FR-071KL-Yageo-datasheet-499455.pdf?src-supplier=Newark, ComponentLink5Description=https://datasheet.octopart.com:443/RC0603FR-071KL-Yageo-datasheet-503470.pdf?src-supplier=Newark, ComponentLink5URL=https://datasheet.octopart.com:443/RC0603FR-071KL-Yageo-datasheet-503470.pdf?src-supplier=Newark, ComponentLink6Description=https://datasheet.octopart.com:443/RC0603FR-071KL-Yageo-datasheet-62067350.pdf?src-supplier=element14+APAC, ComponentLink6URL=https://datasheet.octopart.com:443/RC0603FR-071KL-Yageo-datasheet-62067350.pdf?src-supplier=element14+APAC, ComponentLink7Description=https://datasheet.octopart.com:443/RC0603FR-071KL-Yageo-datasheet-21426514.pdf?src-supplier=element14+APAC, ComponentLink7URL=https://datasheet.octopart.com:443/RC0603FR-071KL-Yageo-datasheet-21426514.pdf?src-supplier=element14+APAC, ComponentLink8Description=https://datasheet.octopart.com:443/RC0603FR-071KL-Yageo-datasheet-141265859.pdf?src-supplier=Upverter, ComponentLink8URL=https://datasheet.octopart.com:443/RC0603FR-071KL-Yageo-datasheet-141265859.pdf?src-supplier=Upverter, ComponentLink9Description=https://datasheet.octopart.com:443/RC0603FR-071KL-Yageo-datasheet-103092701.pdf?src-supplier=Upverter, ComponentLink9URL=https://datasheet.octopart.com:443/RC0603FR-071KL-Yageo-datasheet-103092701.pdf?src-supplier=Upverter, ComponentLink10Description=https://sigma.octopart.com:443/138820526/technical_drawing/Yageo-RC0603FR-071KL.pdf?src-supplier=Upverter, ComponentLink10URL=https://sigma.octopart.com:443/138820526/technical_drawing/Yageo-RC0603FR-071KL.pdf?src-supplier=Upverter, ComponentLink11Description=https://datasheet.octopart.com:443/RC0603FR-071KL-Yageo-datasheet-68297981.pdf?src-supplier=Upverter, ComponentLink11URL=https://datasheet.octopart.com:443/RC0603FR-071KL-Yageo-datasheet-68297981.pdf?src-supplier=Upverter, ComponentLink12Description=https://datasheet.octopart.com:443/RC0603FR-071KL-Yageo-datasheet-8328172.pdf?src-supplier=Farnell, ComponentLink12URL=https://datasheet.octopart.com:443/RC0603FR-071KL-Yageo-datasheet-8328172.pdf?src-supplier=Farnell, ComponentLink13Description=https://datasheet.octopart.com:443/RC0603FR-071KL-Yageo-datasheet-13691069.pdf?src-supplier=Farnell, ComponentLink13URL=https://datasheet.octopart.com:443/RC0603FR-071KL-Yageo-datasheet-13691069.pdf?src-supplier=Farnell, ComponentLink14Description=https://datasheet.octopart.com:443/RC0603FR-071KL-Yageo-datasheet-15599030.pdf?src-supplier=Seeed+Studio, ComponentLink14URL=https://datasheet.octopart.com:443/RC0603FR-071KL-Yageo-datasheet-15599030.pdf?src-supplier=Seeed+Studio, ComponentLink15Description=https://datasheet.octopart.com:443/RC0603FR-071KL-Yageo-Group-datasheet-176638170.pdf?src-supplier=Future+Electronics, ComponentLink15URL=https://datasheet.octopart.com:443/RC0603FR-071KL-Yageo-Group-datasheet-176638170.pdf?src-supplier=Future+Electronics, ComponentLink16Description=https://datasheet.octopart.com:443/RC0603FR-071KL-Yageo-datasheet-164759695.pdf?src-supplier=Future+Electronics, ComponentLink16URL=https://datasheet.octopart.com:443/RC0603FR-071KL-Yageo-datasheet-164759695.pdf?src-supplier=Future+Electronics, ComponentLink17Description=https://datasheet.octopart.com:443/RC0603FR-071KL-Yageo-datasheet-137700087.pdf?src-supplier=Future+Electronics, ComponentLink17URL=https://datasheet.octopart.com:443/RC0603FR-071KL-Yageo-datasheet-137700087.pdf?src-supplier=Future+Electronics, ComponentLink18Description=https://datasheet.octopart.com:443/RC0603FR071KL-Yageo-datasheet-27584510.pdf?src-supplier=Future+Electronics, ComponentLink18URL=https://datasheet.octopart.com:443/RC0603FR071KL-Yageo-datasheet-27584510.pdf?src-supplier=Future+Electronics, ComponentLink19Description=https://datasheet.octopart.com:443/RC0603FR-071KL-Yageo-datasheet-8324193.pdf?src-supplier=Future+Electronics, ComponentLink19URL=https://datasheet.octopart.com:443/RC0603FR-071KL-Yageo-datasheet-8324193.pdf?src-supplier=Future+Electronics, ComponentLink20Description=https://datasheet.octopart.com:443/RC0603FR-071KL-Yageo-datasheet-79472498.pdf?src-supplier=Megastar, ComponentLink20URL=https://datasheet.octopart.com:443/RC0603FR-071KL-Yageo-datasheet-79472498.pdf?src-supplier=Megastar, ComponentLink21Description=https://datasheet.octopart.com/RC0603FR-071KL-Yageo-datasheet-73766026.pdf, ComponentLink21URL=https://datasheet.octopart.com/RC0603FR-071KL-Yageo-datasheet-73766026.pdf, ComponentLink22Description=https://datasheet.octopart.com:443/RC0603FR-071KL-Yageo-datasheet-118562.pdf?src-supplier=DigiKey, ComponentLink22URL=https://datasheet.octopart.com:443/RC0603FR-071KL-Yageo-datasheet-118562.pdf?src-supplier=DigiKey, ComponentLink23Description=http://sigma.octopart.com:80/conflict_mineral_statement/Yageo-company-3.pdf?src-supplier=Compliance+Statements, ComponentLink23URL=http://sigma.octopart.com:80/conflict_mineral_statement/Yageo-company-3.pdf?src-supplier=Compliance+Statements, ComponentLink24Description=http://sigma.octopart.com:80/rohs_statement/Yageo-company-2.pdf?src-supplier=Compliance+Statements, ComponentLink24URL=http://sigma.octopart.com:80/rohs_statement/Yageo-company-2.pdf?src-supplier=Compliance+Statements, Composition="Thick Film", Contact Plating=Tin, Country of Origin="Mainland China, Taiwan", Depth=800µm, Export Control Classification Number (ECCN) Code=EAR99, Harmonized Tariff Schedule (HTS) Code=8533.21.00.30, Height=450µm, Introduction Date=2004-10-04, Lead Free="Lead Free", Length=1.6mm, Lifecycle Status=Production, Military Standard=Not, Mounting Technology="Surface Mount", Number of Terminals=2, Packaging="Tape and Reel", Pins=2, Pricing="1=0,1, 10=0,025, 25=0,0188, 50=0,015, 100=0,0122, 250=0,0094, 500=0,00782, 1000=0,00661 (USD)", Radiation Hardening=No, REACH SVHC=Unaffected, RoHS=Compliant, Schedule B="8533210045, 8533210045|8533210045|8533210045|8533210045|8533210045|8533210045|8533210045|8533210045|8533210045|8533210045|8533210045|8533210045|8533210045|8533210045|8533210045|8533210045|8533210045|8533210045|8533210045|8533210045|8533210045|8533210045|8533210045|85", Stock=2826782, Supplier=DigiKey, Termination=SMD/SMT, Tolerance=1%, Voltage Rating (DC)=50V, Width=800µm
S1 S2 S3 S4: "Switch Tactile N.O. SPST Flat Round Button PC Pins 0.05A 24VDC 1000000Cycles 0.98N Thru-Hole Bag", Package=None, Check_prices=https://www.snapeda.com/parts/B3F1000/Omron/view-part/?ref=eda, MF=Omron, MP=B3F1000, SnapEDA_Link=https://www.snapeda.com/parts/B3F1000/Omron/view-part/?ref=snap
U1 U2: "Linear Voltage Regulator IC Positive Fixed 1 Output 1A SOT-223-3L", Package="SOT-223-3L UMW", Check_prices=https://www.snapeda.com/parts/AMS1117-3.3/UMW/view-part/?ref=eda, MF=UMW, MP=AMS1117-3.3, SnapEDA_Link=https://www.snapeda.com/parts/AMS1117-3.3/UMW/view-part/?ref=snap

## Via types
v1: diameter 0.508, hole 0.254, Top Layer to Bottom Layer, 63 vias

## Nets (pads, with @x,y where several pads share a name; then routed paths per layer and width w, separated by ;. In a path a pad name is that pad's centre, name@x,y a point inside that pad or via, vN(x,y) a via of type N, cw(c..) or ccw(c..) an arc to the next point about the centre after c; other vN are vias at no path point)
3V3_HSPI: C3.2 C4.1 J3.2 R1.2 U1.2 | length 23.8
  Top Layer w0.4: C3.2 52.903,57.528 J3.2 56.446,56.3 v1(56.5,56.3) ; v1(56.5,52.9) 57.196,52.9 R1.2 55.34,49.638 C4.1 57.64,47.2 57.655,47.2 U1.2@64.345,47.2
  Bottom Layer w0.4: v1(56.5,52.9) v1(56.5,56.3)
3V3_VSPI: C7.2 C8.1 J2.2 R2.2 U2.2 | length 23.3
  Top Layer w0.4: C7.2 100.215,57.34 J2.2 v1(103.7,56.1) ; v1(103.9,53.2) 104.325,53.2 R2.2 103.14,50.015 C8.1 105.44,47.2 105.455,47.2 U2.2@112.145,47.2
  Bottom Layer w0.4: v1(103.7,56.1) 103.7,53.4 v1(103.9,53.2)
5V: C1.2 C2.2 C5.2 C6.2 J1.30 U1.3 U2.3 | length 10.3
  Top Layer w0.4: v1(55.1,42.9) 55.125,42.925 C1.2 C2.2 ; v1(57.6,43.4) 57.655,43.455 U1.3 ; v1(102.8,42.9) 102.825,42.925 C5.2 C6.2 ; U2.3 105.455,43.445 v1(105.5,43.4)
BTN_BACK: J1.5 S4.1 | length 30
  Top Layer w0.15: J1.5 98.46,45.16 v1(98.5,45.2) ; v1(98.6,37.4) v1(113.4,37.4)
  Bottom Layer w0.15: v1(98.5,45.2) 98.5,37.5 v1(98.6,37.4) ; v1(113.4,37.4) 113.411,37.389 S4.1
BTN_DOWN: J1.24 S2.1 | length 28.2
  Top Layer w0.15: S2.1 60.1,35.6 v1(67.4,35.6) ; v1@67.44,50.24 J1.24
  Top Layer w0.254: v1(67.4,50.2) v1@67.44,50.24
  Bottom Layer w0.15: v1(67.4,35.6) v1(67.4,50.2)
BTN_ENTER: J1.7 S3.1 | length 20.4
  Top Layer w0.15: J1.7 96.46,50.24 v1(97.3,49.4) ; v1(97.8,36.4) S3.1@100.962,33.238
  Top Layer w0.254: S3.1@100.962,33.238 S3.1
  Bottom Layer w0.15: v1(97.3,49.4) 97.3,36.9 v1(97.8,36.4)
BTN_UP: J1.22 S1.1 | length 44.3
  Top Layer w0.15: S1.1 48.542,35.5 v1(50.3,35.5) ; v1(50.3,37.5) v1(65.9,37.5) ; v1@66.82,55.32 J1.22
  Top Layer w0.254: v1(66.8,55.3) v1@66.82,55.32
  Bottom Layer w0.15: v1(50.3,35.5) v1(50.3,37.5) ; v1(65.9,37.5) 65.9,54.4 v1(66.8,55.3)
CE_HSPI: J1.6 J3.3 | length 45.1
  Top Layer w0.15: J3.3 59.602,53.144 67.144,53.144 68.1,54.1 v1(88.4,54.1) ; v1(88.4,47.8) 95.3,47.8 J1.6
  Bottom Layer w0.15: v1(88.4,47.8) v1(88.4,54.1)
CE_VSPI: J1.14 J2.3 | length 23
  Top Layer w0.15: J1.14 103.28,68.02 v1(103.4,67.9) ; J2.3 105,54.9 105.1,54.9 v1(106.3,56.1)
  Bottom Layer w0.15: v1(103.4,67.9) 106.4,64.9 106.4,56.2 v1(106.3,56.1)
CSN_HSPI: J1.3 J3.4 | length 57.2
  Top Layer w0.15: J3.4 59.33,59.1 v1(73.8,59.1) ; v1(73.9,40.2) 95.28,40.2 J1.3
  Bottom Layer w0.15: v1(73.8,59.1) 73.8,40.3 v1(73.9,40.2)
CSN_VSPI: J1.11 J2.4 | length 12.7
  Top Layer w0.15: J1.11 v1(105,60.4)
  Bottom Layer w0.15: J2.4 v1(105,60.4)
ESP32_3V3: J1.1 J4.1 S1.4 S2.4 S3.4 S4.4 | length 95.7
  Top Layer w0.254: J4.1 49.151,39.751 v1(49.2,39.8) ; v1(49.3,28.5) 49.316,28.484 S1.4 54.51,26.5 62,26.5 S2.4 88.9,28.5 J1.1 95.6,34.8 v1(97.7,34.8) ; v1(97.7,31.3) v1(105.3,31.3) ; v1(105.4,28.7) 105.438,28.738 S3.4 109.736,26.9 118.109,26.9 S4.4
  Bottom Layer w0.254: v1(49.2,39.8) 49.2,28.6 v1(49.3,28.5) ; v1(97.7,31.3) v1(97.7,34.8) ; v1(105.3,31.3) 105.3,28.8 v1(105.4,28.7)
GND: C1.1 C2.1 C3.1 C4.2 C5.1 C6.1 C7.1 C8.2 D1.1 D2.1 J1.2 J1.29 J2.1 J3.1 J4.2 U1.1 U2.1 | length 33.6
  Top Layer w0.4: v1(50.6,49.5) C4.2 52.26,47.915 C2.1 C1.1 v1(52.3,44.4) ; v1(50.8,55.5) 50.825,55.475 C3.1 52.787,54.988 J3.1 ; U1.1 57.665,49.5 v1(59.3,49.5) ; D1.1 65.297,52.197 v1(65.3,52.2) ; v1(98.2,55.3) 98.225,55.275 C7.1 100.075,54.8 J2.1 ; v1(98.5,49.5) C8.2 100.06,47.815 C6.1 C5.1 v1(99.9,44.4) ; U2.1 107.49,49.49 v1(107.5,49.5) ; D2.1 v1(112.3,52.2)
MISO_HSPI: J1.27 J3.7 | length 19
  Top Layer w0.15: J3.7 65.812,54.988 v1(66.6,54.2) ; v1@66.72,42.62 J1.27
  Top Layer w0.254: v1(66.7,42.6) v1@66.72,42.62
  Bottom Layer w0.15: v1@66.6,42.7 v1(66.6,54.2)
  Bottom Layer w0.254: v1@66.6,42.7 v1(66.7,42.6)
MISO_VSPI: J1.10 J2.7 | length 21.8
  Top Layer w0.15: J1.10 v1(97.36,57.86) ; v1(97.4,52.2) v1(103.9,52.2) ; v1(105.3,53.5) 105.5,53.7 108.98,53.7 J2.7
  Top Layer w0.254: J2.7@109.7,54.8 J2.7
  Bottom Layer w0.15: v1(97.4,52.2) v1@97.4,57.82 ; v1@104,52.2 v1(105.3,53.5)
  Bottom Layer w0.254: v1(97.36,57.86) v1@97.4,57.82 ; v1(103.9,52.2) v1@104,52.2
MOSI_HSPI: J1.28 J3.6 | length 27.1
  Top Layer w0.15: J3.6 61.5,56.326 v1(61.5,56.3) ; v1(61,40.1) 69.98,40.1 J1.28
  Bottom Layer w0.15: v1(61,40.1) 61,53.5 61.5,54 v1(61.5,56.3)
MOSI_VSPI: J1.15 J2.6 | length 25.3
  Top Layer w0.15: J1.15 107.44,70.56 v1(107.5,70.5)
  Bottom Layer w0.15: v1(107.5,70.5) 107.5,57.38 J2.6
NetD1_2: D1.2 R1.1 | length 2.5
  Top Layer w0.254: R1.1 D1.2
NetD2_2: D2.2 R2.1 | length 2.4
  Top Layer w0.254: R2.1 D2.2
SCK_HSPI: J1.26 J3.5 | length 20
  Top Layer w0.15: J3.5 60.298,53.702 v1(60.3,53.7) ; v1(60.3,44.8) 69.64,44.8 J1.26
  Bottom Layer w0.15: v1(60.3,44.8) v1(60.3,53.7)
SCK_VSPI: J1.9 J2.5 | length 18.1
  Top Layer w0.15: J1.9 97.82,52.9 v1(102.2,52.9) ; v1(105,50.8) v1(106.1,50.8) ; v1(106.3,54.4) 106.7,54.8 J2.5
  Bottom Layer w0.15: v1(102.2,52.9) 102.7,52.4 102.7,51.6 104.2,51.6 v1(105,50.8) ; v1(106.1,50.8) 106.1,54.2 v1(106.3,54.4)
SCL_OLED: J1.25 J4.4 | length 32.2
  Top Layer w0.15: J4.4 50.149,47.251 v1(50.2,47.2) ; v1(51.4,41.5) 62.9,41.5 65.3,43.9 v1(68.1,43.9) ; v1(68.2,47.5) 68.3,47.6 69.9,47.6 J1.25
  Bottom Layer w0.15: v1(50.2,47.2) 50.2,42.7 v1(51.4,41.5) ; v1(68.1,43.9) 68.1,47.5 v1(68.2,47.5)
SDA_OLED: J1.23 J4.3 | length 25.8
  Top Layer w0.15: J4.3 49.451,44.751 v1(51.7,47) ; v1(57.9,48.5) 62.3,48.5 64.8,51 68.22,51 J1.23
  Bottom Layer w0.15: v1(51.7,47) 52.1,47.4 56.3,47.4 57.4,48.5 v1(57.9,48.5)
pads on no net: J1.4 J1.8 J1.12 J1.13 J1.16 J1.17 J1.18 J1.19 J1.20 J1.21 J2.8 J3.8 S1.2 S1.3 S2.2 S2.3 S3.2 S3.3 S4.2 S4.3

## Polygon pours and split planes (outlines as drawn)
5V on Top Layer "5V_L01_P000" (solid, pour order 0): 43,25 43,80 123,80 123,25
GND on Bottom Layer "GND_L02_P001" (solid, pour order 1): 43,25 43,80 123,80 123,25

## Silkscreen, mask and mechanical layers (free items; w line width, h text height)
Board Shape:
  the board outline again, w0.4